# Altium PCB Receiver_PCB_v1.0.PcbDoc
Units mil, origin at the board's own origin, x right, y up, seen from the top; angles counter-clockwise.
Board outline 1181.1 x 426.58 mil, 2 copper layers (Top Layer, Bottom Layer), stack 57 mil thick; 10 components, 8 nets, 28 pads, 2 vias.
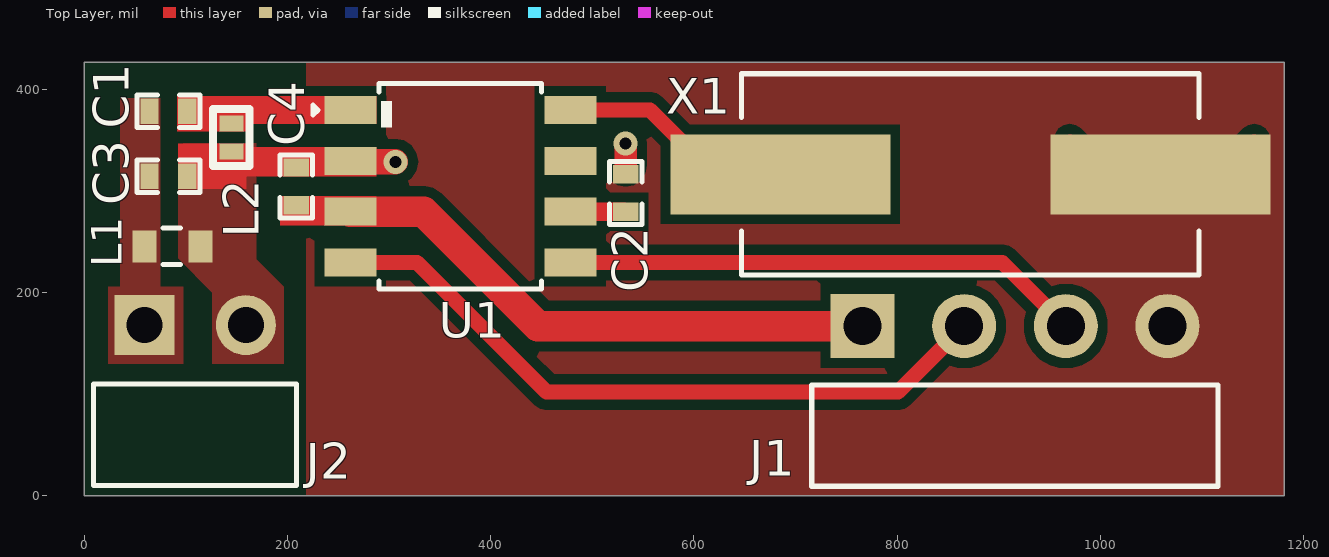
[diagram p0: Top Layer view]
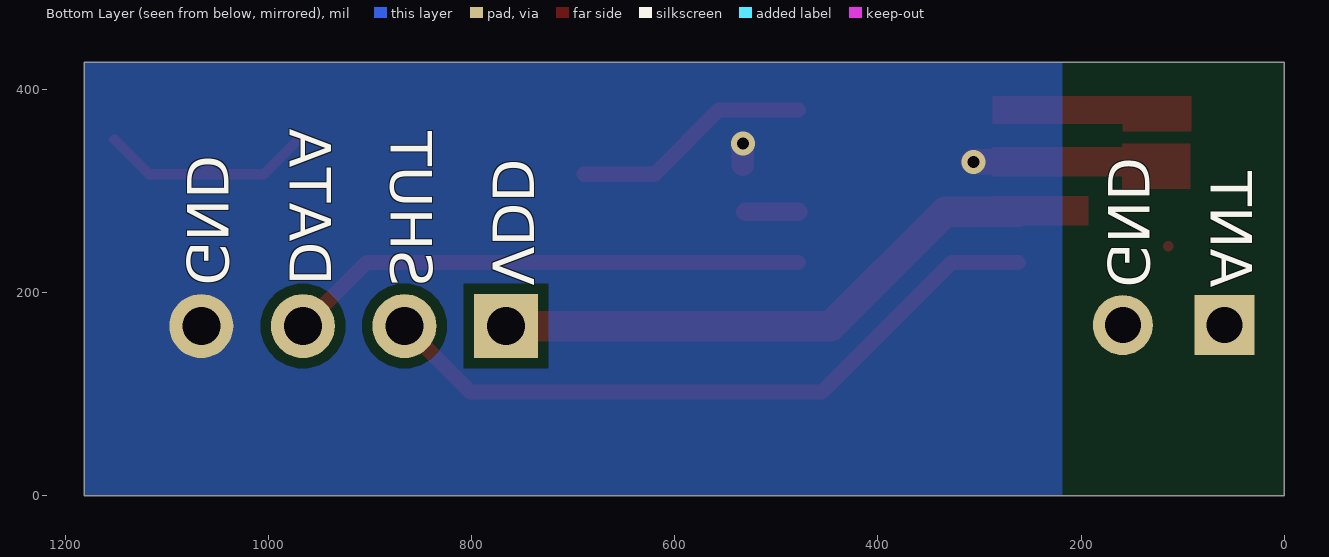
[diagram p1: Bottom Layer view, seen from below]
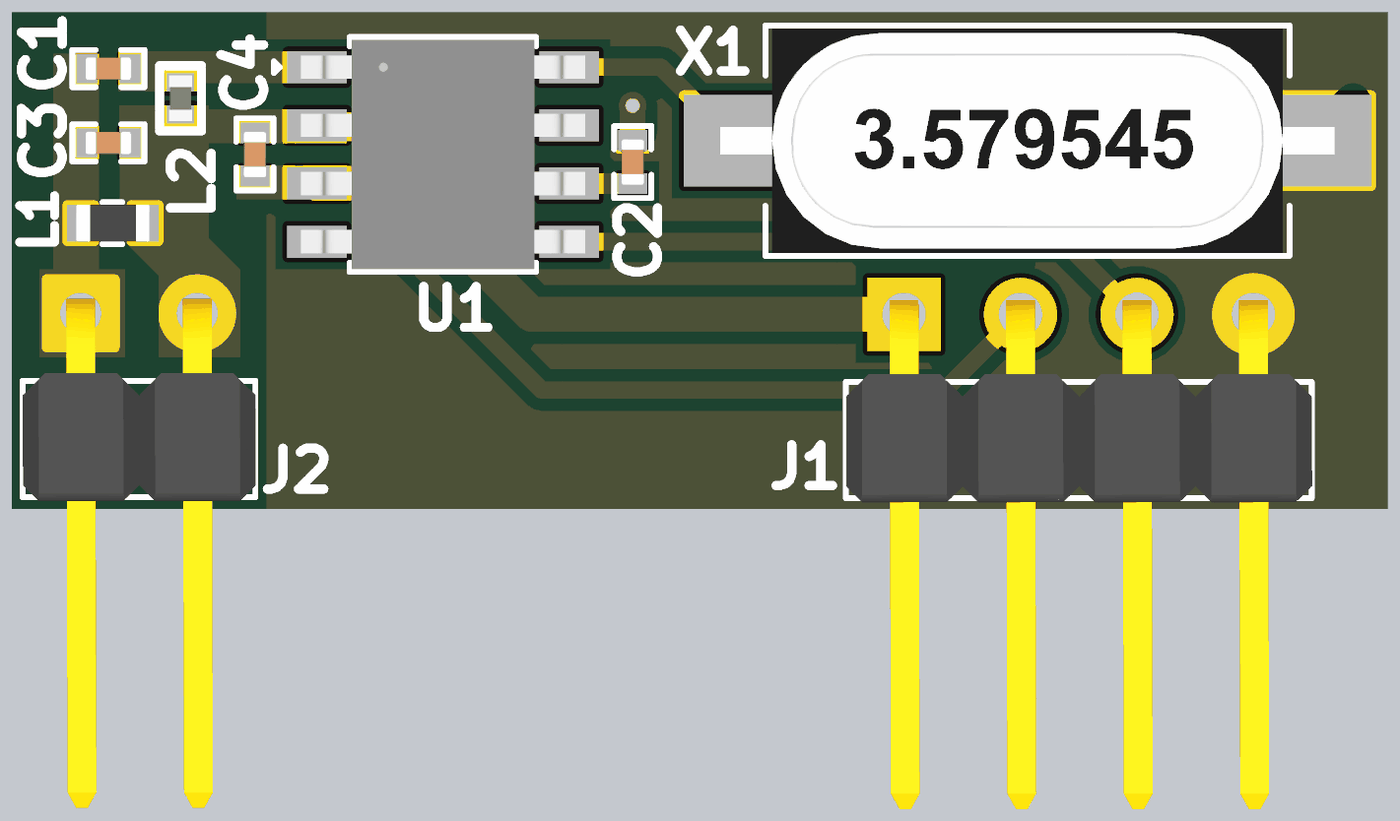
[diagram p2: 3D render of the assembled board from above, using the file's embedded part models]

## Layer stack, top to bottom
Top Solder: solder mask 3, Solder Resist, Dk 3.5
Top Layer: signal copper 10
Dielectric 1: core 37, FR-4, Dk 4.8
Bottom Layer: signal copper 10
Bottom Solder: solder mask 3, Solder Resist, Dk 3.5

## Board outline
0,0 1181.1,0 1181.1,426.58 0,426.58

## Design rules (kind name [scope] priority, off if disabled: settings)
Clearance [All] p1: gap=10 ignorepadtopadclearanceinfootprint=FALSE
HoleToHoleClearance [All] p1: gap=0 allowstackedmicrovias=TRUE
MinimumSolderMaskSliver [All] p1: minsoldermaskwidth=0
PolygonConnect [All] p1: connectstyle=Direct reliefconductorwidth=10 reliefentries=4 polygonreliefangle="90 Angle" airgapwidth=10
RoutingVias [All] p1: holewidth=11.81 width=23.62 viastyle="Through Hole" minholewidth=11.81 minwidth=23.62 maxholewidth=11.81 maxwidth=23.62
SilkToSilkClearance [All] p1: silktosilkclearance=0
SilkToSolderMaskClearance [IsPad] p1: minsilkscreentomaskgap=0 clearancetoexposedcopper=TRUE
SolderMaskExpansion [All] p1: expansion=4 istentingtop=FALSE
Width [All] p1: maxlimit=50 minlimit=10 preferedwidth=15 minimp=50.000000 maximp=50.000000 favimp=50.000000
26 further rules are at their usual default settings.

## Components (designator, comment, footprint, x,y, rotation, side; value= is the part's Value field where it differs from the comment)
C1 "2.4pF" Cap-0402 82.76,378.35 r0 top
C2 "0.1uF" Cap-0402 533,298 r90 top locked value=100nF
C3 "6pF" Cap-0402 82.76,314.47 r180 top
C4 "0.1uF" Cap-0402 208.6,304.54 r270 top value=100nF
J1 "PZ254R-11-04P" "HDR1X4 (R/A Male)" 766,167.02 r0 top locked
J2 "PZ254R-11-02P" "HDR1X2 (R/A Male)" 59,168 r0 top locked
L1 "27nH" "IND-0603 (1608 Metric)" 86.61,245.48 r180 top
L2 "33nH" IND-0402 144.69,352.76 r90 top locked
U1 "WF531RA N S8T" SOP-8 370.08,304.54 r0 top locked
X1 "SXMH6.7458F2020F30" HC-49S-SMD 871.98,316.35 r0 top locked

## Footprints (in the part's own frame and the unit in brackets; to place one, negate y for a bottom-side part, rotate by r counter-clockwise, add the part's x,y. Pads: shape width x height; smd on the part's side, far side on the other; paste and mask are expansions set on the pad)
Cap-0402 [mil]
  rect 18x25 smd mask+2.36: 1(-18.5,0) 2(18.5,0)
  silkscreen extent -31,-16 31,16, body extent -20,-10 20,10, height 19
HC-49S-SMD [mm]
  rect 5.5x2 smd: 1(-4.75,0) 2(4.75,0)
  silkscreen extent -5.71,-2.51 5.71,2.51, body extent -6.7,-2.45 6.7,2.45, height 4.4
"HDR1X2 (R/A Male)" [mm] "CONN HEADER VERT 2POS 2.54MM"
  rect 1.5x1.5 hole 0.9: 1(0,0)
  round 1.5 hole 0.9: 2(2.54,0)
  silkscreen extent -1.27,-4.01 3.81,-1.47, body extent -1.27,-10.8 3.82,0.32, height 3.09
"HDR1X4 (R/A Male)" [mm] "Connector; Header; 4 Position"
  rect 1.6x1.6 hole 0.95: 1(0,0)
  round 1.6 hole 0.95: 2(2.54,0) 3(5.08,0) 4(7.62,0)
  silkscreen extent -1.27,-4.01 8.89,-1.47, body extent -1.27,-10.8 8.9,0.32, height 3.09
IND-0402 [mm]
  rect 0.4x0.6 smd: 1(-0.35,0) 2(0.35,0)
  silkscreen extent -0.71,-0.46 0.71,0.46, body extent -0.5,-0.25 0.5,0.25, height 0.25
"IND-0603 (1608 Metric)" [mm] "0.063\" L x 0.032\" W (1.60mm x 0.80mm)"
  rect 0.6x0.8 smd: 1(-0.7,0) 2(0.7,0)
  silkscreen extent -0.2,-0.46 0.23,0.46, body extent -0.8,-0.4 0.8,0.4, height 0.78
SOP-8 [mm]
  rect 1.3x0.7 smd: 1(-2.75,1.905) 2(-2.75,0.635) 3(-2.75,-0.635) 4(-2.75,-1.905) 5(2.75,-1.905) 6(2.75,-0.635) 7(2.75,0.635) 8(2.75,1.905)
  silkscreen extent -3.69,-2.57 2.03,2.57, body extent -3.1,-2.5 3.1,2.5, height 1.76

## Part data
C1: library part 0402CG2R4C500NT, "50V 2.4pF C0G 0402 Multilayer Ceramic Capacitors MLCC - SMD/SMT ROHS", LCSC Part Number=C48346, Manufacturer=FH, Package=0402, ComponentLink1Description=LCSC, Item Type=Capacitor, Manufacturer Part Number=0402CG2R4C500NT
C2 C4: library part GRM155R71C104KA88D, "CAP CER 0.1UF 16V X7R 0402", Case Code (Imperial)=0402, Case Code (Metric)=1005, Dielectric=X7R, Dielectric Material=Ceramic, Insulation Resistance=10GR, LCSC Part Number=C71629, Manufacturer=Murata, Max Operating Temperature=125°C, Min Operating Temperature=-55°C, Package Quantity=1, Tolerance=10%, Voltage=16V, Case/Package=0402, Category="Ceramic Capacitors", ComponentLink1Description=https://datasheet.ciiva.com/129/grm155r71c104ka88-01-129739.pdf?src-supplier=Digi-Key, ComponentLink1URL=https://datasheet.ciiva.com/129/grm155r71c104ka88-01-129739.pdf?src-supplier=Digi-Key, ComponentLink2Description=https://datasheet.ciiva.com/129/grm155r71c104ka88-01-129740.pdf?src-supplier=Digi-Key, ComponentLink2URL=https://datasheet.ciiva.com/129/grm155r71c104ka88-01-129740.pdf?src-supplier=Digi-Key, ComponentLink3Description=https://datasheet.ciiva.com/18102/getdatasheetpartid-85307-18102905.pdf?src-supplier=Verical, ComponentLink3URL=https://datasheet.ciiva.com/18102/getdatasheetpartid-85307-18102905.pdf?src-supplier=Verical, ComponentLink4Description=https://datasheet.ciiva.com/29199/454098-da-01-en-vs-kondensator-0402-29199799.pdf?src-supplier=Conrad, ComponentLink4URL=https://datasheet.ciiva.com/29199/454098-da-01-en-vs-kondensator-0402-29199799.pdf?src-supplier=Conrad, ComponentLink5Description=https://datasheet.ciiva.com/7937/4360-7937615.pdf?src-supplier=Element14, ComponentLink5URL=https://datasheet.ciiva.com/7937/4360-7937615.pdf?src-supplier=Element14, ComponentLink6Description=https://datasheet.ciiva.com/14116/grmseries-highdielectrictype-eng-14116878.pdf?src-supplier=Distrelec, ComponentLink6URL=https://datasheet.ciiva.com/14116/grmseries-highdielectrictype-eng-14116878.pdf?src-supplier=Distrelec, ComponentLink7Description=https://datasheet.ciiva.com/14103/grmseries-highdielectrictype-eng-14103750.pdf?src-supplier=Distrelec, ComponentLink7URL=https://datasheet.ciiva.com/14103/grmseries-highdielectrictype-eng-14103750.pdf?src-supplier=Distrelec, ComponentLink8Description=https://datasheet.ciiva.com/28534/4360-28534127.pdf?src-supplier=Element14, ComponentLink8URL=https://datasheet.ciiva.com/28534/4360-28534127.pdf?src-supplier=Element14, ComponentLink9Description=https://datasheet.ciiva.com/28534/4360-28534133.pdf?src-supplier=Element14, ComponentLink9URL=https://datasheet.ciiva.com/28534/4360-28534133.pdf?src-supplier=Element14, ComponentLink10Description=https://datasheet.ciiva.com/16199/product-16199000.pdf?src-supplier=Future+Electronics, ComponentLink10URL=https://datasheet.ciiva.com/16199/product-16199000.pdf?src-supplier=Future+Electronics, Depth=0.5mm, Height=0.5mm, Item Type=Capacitor, Lead Free="Lead Free", Length=1mm, Manufacturer Part Number=GRM155R71C104KA88D, Material=Ceramic, Mounting Technology="Surface Mount", Packaging="Tape and Reel", Pins=2, Pricing 1="10000=0.00480, 30000=0.00470, 100000=0.00350, 250000=0.00330 (USD)", Radiation Hardening=No, RoHS=Yes, RoHS Compliant=Yes, Series=GRM, Stock 1=1690322, Supplier 1="Arrow Electronics", Supplier Part Number 1=GRM155R71C104KA88D, Termination=SMD/SMT, Thickness=0.022inch, Voltage Rating=16V, Voltage Rating (DC)=16V, Width=0.02inch
C3: library part 0402CG6R0C500NT, "50V 6pF C0G 0402 Multilayer Ceramic Capacitors MLCC - SMD/SMT ROHS", LCSC Part Number=C1575, Manufacturer="FH (Guangdong Fenghua Advanced Tech)", Package=0402, ComponentLink1Description=LCSC, Item Type=Capacitor, Manufacturer Part Number=0402CG6R0C500NT
J1: "Right-Angle Square Pins 2.5mm 4P 6mm -40℃~+105℃ 2.54mm Plugin Black Brass 1x4P Push-Pull,P=2.54mm Pin Headers ROHS", LCSC Part Number=C492412, Manufacturer=XFCN, Package=Push-Pull,P=2.54mm, ComponentLink1Description=LCSC, ComponentLink1URL=https://www.lcsc.com/product-detail/Pin-Headers_XFCN-PZ254R-11-04P_C492412.html, Item Type="R/A Male Header", Manufacturer Part Number=PZ254R-11-04P
J2: "Right-Angle Square Pins 2.5mm 2P 6mm -40℃~+105℃ 2.54mm Plugin Black Brass 1x2P Push-Pull,P=2.54mm Pin Headers ROHS", LCSC Part Number=C492410, Manufacturer=XFCN, Package=Push-Pull,P=2.54mm, ComponentLink1Description=LCSC, ComponentLink1URL=https://www.lcsc.com/product-detail/Pin-Headers_XFCN-PZ254R-11-02P_C492410.html, Item Type="R/A Male Header", Manufacturer Part Number=PZ254R-11-02P
L1: library part LQW18AN27NG10D, "FIXED IND 27NH 590MA 116MOHM SMD", Case Code (Imperial)=0603, Case Code (Metric)=1608, Current Rating=590mA, DC Resistance (DCR)=116mR, Inductance Tolerance=2%, LCSC Part Number=C701182, Manufacturer=Murata, Max Operating Temperature=125°C, Min Operating Temperature=-55°C, Package Quantity=1, Resistor Type=Wirewound, Self Resonant Frequency=2.8GHz, Test Frequency=100MHz, Case/Package=0603, Category="Fixed Inductors", ComponentLink1Description=https://datasheet.ciiva.com/11799/0900766b80a002db-11799175.pdf?src-supplier=RSComponents, ComponentLink1URL=https://datasheet.ciiva.com/11799/0900766b80a002db-11799175.pdf?src-supplier=RSComponents, ComponentLink2Description=https://datasheet.ciiva.com/6705/l0075s0080lqw18a-10-6705574.pdf?src-supplier=Digi-Key, ComponentLink2URL=https://datasheet.ciiva.com/6705/l0075s0080lqw18a-10-6705574.pdf?src-supplier=Digi-Key, ComponentLink3Description=https://datasheet.ciiva.com/8507/l0075s0080lqw18a-10-8507510.pdf?src-supplier=Avnet, ComponentLink3URL=https://datasheet.ciiva.com/8507/l0075s0080lqw18a-10-8507510.pdf?src-supplier=Avnet, ComponentLink4Description=https://datasheet.ciiva.com/4978/product-4978252.pdf?src-supplier=Mouser, ComponentLink4URL=https://datasheet.ciiva.com/4978/product-4978252.pdf?src-supplier=Mouser, Core Material=Non-Magnetic, DC Current=590mA, Depth=1.1mm, Height=0.8mm, Height - Seated (Max)=0.039inch, Inductance=27nH, Item Type=Inductor, Lead Free="Lead Free", Length=1.6mm, Manufacturer Part Number=LQW18AN27NG10D, Max DC Current=590mA, Military Standard=Not, Mount="Surface Mount", Packaging="Tape and Reel", Pricing 1="1=0.17550, 10=0.13260, 25=0.13120, 100=0.10470, 250=0.09530, 500=0.08580, 1000=0.07160, 3000=0.06500 (USD)", Q Factor=42, Radiation Hardening=No, Reach SVHC Compliant=Yes, RoHS=Yes, RoHS Compliant=Yes, Series=LQW18A_10, Shielding=Unshielded, Stock 1=3528, Supplier 1="Arrow Electronics", Supplier Part Number 1=LQW18AN27NG10D, Termination=SMD/SMT, Tolerance=2%, Weight=0.000106oz, Width=0.031inch
L2: library part LQG15HN33NH02D, "300mA 33nH ±3% 670mΩ 0402 Inductors (SMD) ROHS", LCSC Part Number=C2044267, Manufacturer="Murata Electronics", Package=0402, ComponentLink1Description=LCSC, ComponentLink1URL=https://www.lcsc.com/product-detail/Inductors-SMD_Murata-Electronics-LQG15HN33NH02D_C2044267.html, Item Type=Inductor, Manufacturer Part Number=LQG15HN33NH02D
U1: "SOP-8 RF Transceiver ICs ROHS", LCSC Part Number=C2886629, Manufacturer=WF, Package=SOP-8, Item Type=IC, Manufacturer Part Number="WF531RA N S8T"
X1: "6.7458MHz 20pF ±20ppm HC-49S-SMD Crystals ROHS", LCSC Part Number=C2901748, Manufacturer="Shenzhen SCTF Elec", Package=HC-49S-SMD, ComponentLink1Description=LCSC, ComponentLink1URL=https://www.lcsc.com/product-detail/Crystals_Shenzhen-SCTF-Elec-SXMH6-7458F2020F30_C2901748.html, Item Type=Crystals, Manufacturer Part Number=SXMH6.7458F2020F30

## Via types
v1: diameter 23.62, hole 11.81, Top Layer to Bottom Layer, tented both sides, 2 vias

## Nets (pads, with @x,y where several pads share a name; then routed paths per layer and width w, separated by ;. In a path a pad name is that pad's centre, name@x,y a point inside that pad or via, vN(x,y) a via of type N, cw(c..) or ccw(c..) an arc to the next point about the centre after c; other vN are vias at no path point)
Antenna: C1.1 C3.2 J2.1 L1.2
DO: J1.3 U1.5 | length 513.6
  Top Layer w15: U1.5 903.48,229.54 J1.3
GND: C2.2 C3.1 C4.1 J1.4 J2.2 L1.1 L2.1 U1.2 X1.2 | length 292.4
  Top Layer w10: L1.1@114.09,245.39 L1.1 ; C4.1@211.08,321.52 C4.1@212.6,323.04 ; X1.2@970.07,350.72 1004.44,316.35 X1.2@1053.15,316.35 ; X1.2@1062.99,326.19 X1.2@1053.15,316.35 ; X1.2@1151.57,350.72 1117.2,316.35 X1.2@1053.15,316.35
  Top Layer w22: C2.2@532.9,325.5 v1(532.9,346.47)
  Top Layer w25: U1.2@260.81,328.54 v1(306.09,328.54)
NetC1_2: C1.2 L2.2 U1.1
NetC2_1: C2.1 U1.6 | length 52.2
  Top Layer w18: U1.6 C2.1@530.5,279.54
NetU1_8: U1.8 X1.1 | length 236.8
  Top Layer w15: U1.8 556.89,379.54 620.08,316.35 X1.1@688.98,316.35
Shut: J1.2 U1.4 | length 683.9
  Top Layer w15: U1.4 327.46,229.54 333.99,223.01 455,102 800.98,102 J1.2
VDD: C4.2 J1.1 U1.3 | length 559.8
  Top Layer w15: C4.2@212.6,277.04 C4.2@212.6,286.04
  Top Layer w30: U1.3 333.86,279.54 446.38,167.02 J1.1
pads on no net: U1.7

## Polygon pours and split planes (outlines as drawn)
GND on Top Layer "GND_L01_P002" (solid, pour order 2): 218.49,0 1181.1,0 1181.1,426.58 218.49,426.58
GND on Top Layer "GND_L01_P005" (solid, remove dead copper, pour order 5): 92.17,346.86 92.26,346.78 92.26,271.33 92.26,233.76 125.98,200.03 125.98,130 196.1,130 196.1,205.76 169,232.85 169,346.86
Antenna on Top Layer "ANTENNA_L01_P001" (solid, pour order 1): 74.8,205.76 97.24,205.76 97.24,130 23.62,130 23.62,205.76 35.43,205.76 35.43,391.07 74.8,391.07
GND on Bottom Layer "GND_L02_P006" (solid, pour order 6): 218.49,0 1181.1,0 1181.1,426.58 218.49,426.58

## Other copper
Top Layer:
  region net NetC1_2: 159.05,393.3 91.38,393.3 91.38,358.39 159.05,358.39
  rectangle net GND: 92.17,302.04 159.84,346.86
  rectangle net GND: 92.26,314.04 287.4,343.31
  rectangle net VDD: 192.6,265.76 287.4,295.04
  rectangle net NetC1_2: 92.26,365.76 287.4,393.31

## Silkscreen, mask and mechanical layers (free items; w line width, h text height)
Bottom Overlay:
  text "VDD" at 792.67,206.59 h70 r90
  text "SHUT" at 893.5,205.77 h70 r90
  text "DATA" at 992.67,206.59 h70 r90
  text "GND" at 1093.5,206.59 h70 r90
  text "ANT" at 86.44,204.59 h70 r90
  text "GND" at 187.26,204.59 h70 r90
Board Outline:
  the board outline again, w10
Fabrication:
  drawing of 191 lines, arcs and shapes, not listed
  text "Layer" at 1359.5,468.79 h60
  text "Name" at 1769.41,468.79 h60
  text "Material" at 2699.16,468.79 h60
  text "Thickness" at 3558.92,468.79 h60
  text "Constant" at 4208.76,468.79 h60
  text "Board Layer Stack" at 4778.62,468.79 h60
  text "Top Overlay" at 1769.41,348.79 h60
  text "Top Solder" at 1769.41,228.79 h60
  text "Solder Resist" at 2699.16,228.79 h60
  text "3.00mil" at 3558.92,228.79 h60
  text "3.5" at 4208.76,228.79 h60
  text "1" at 1359.5,108.79 h60
  text "Top Layer" at 1769.41,108.79 h60
  text "10.00mil" at 3558.92,108.79 h60
  text "Dielectric 1" at 1769.41,-11.21 h60
  text "FR-4" at 2699.16,-11.21 h60
  text "37.00mil" at 3558.92,-11.21 h60
  text "4.8" at 4208.76,-11.21 h60
  text "2" at 1359.5,-131.21 h60
  text "Bottom Layer" at 1769.41,-131.21 h60
  text "10.00mil" at 3558.92,-131.21 h60
  text "Bottom Solder" at 1769.41,-251.21 h60
  text "Solder Resist" at 2699.16,-251.21 h60
  text "3.00mil" at 3558.92,-251.21 h60
  text "3.5" at 4208.76,-251.21 h60
  text "Bottom Overlay" at 1769.41,-371.21 h60
  text "Total board thickness:" at 1359.5,-491.21 h60
  text "63.00mil" at 3558.92,-491.21 h60
Drill Drawing:
  circle w10: c53.69,1239.33 r33.33
  lines w10: 20.36,972.67 87.02,972.67 53.69,906 20.36,972.67 ; 20.36,1056 87.02,1056 87.02,1122.67 20.36,1122.67 20.36,1056
  lines w15: -39.44,861 6960.67,861 ; -39.44,1311 6960.67,1311 ; 511.44,711 511.44,1461 ; 991.32,711 991.32,1461 ; 2091,711 2091,1461 ; 2596.88,711 2596.88,1461 ; 3330.68,711 3330.68,1461 ; 4830.23,711 4830.23,1461 ; 5420.08,711 5420.08,1461 ; 6165.88,711 6165.88,1461 ; -39.44,711 6960.67,711 6960.67,1461 -39.44,1461 -39.44,711
  text "Symbol" at 50.56,1356 h72
  text "Count" at 556.44,1356 h72
  text "Hole Size" at 1036.32,1356 h72
  text "Plated" at 2136,1356 h72
  text "Hole Type" at 2641.88,1356 h72
  text "Drill Layer Pair" at 3375.68,1356 h72
  text "Via/Pad" at 4875.23,1356 h72
  text "Pad Shape" at 5465.08,1356 h72
  text "Template" at 6210.88,1356 h72
  text "2" at 556.44,1206 h60
  text "11.81mil (0.300mm)" at 1036.32,1206 h60
  text "PTH" at 2136,1206 h60
  text "Round" at 2641.88,1206 h60
  text "Top Layer - Bottom Layer" at 3375.68,1206 h60
  text "Via" at 4875.23,1206 h60
  text "Rounded" at 5465.08,1206 h60
  text "v60h30m0mx0" at 6210.88,1206 h60
  text "2" at 556.44,1056 h60
  text "35.43mil (0.900mm)" at 1036.32,1056 h60
  text "PTH" at 2136,1056 h60
  text "Round" at 2641.88,1056 h60
  text "Top Layer - Bottom Layer" at 3375.68,1056 h60
  text "Pad" at 4875.23,1056 h60
  text "(Mixed)" at 5465.08,1056 h60
  text "(Mixed)" at 6210.88,1056 h60
  text "4" at 556.44,906 h60
  text "37.40mil (0.950mm)" at 1036.32,906 h60
  text "PTH" at 2136,906 h60
  text "Round" at 2641.88,906 h60
  text "Top Layer - Bottom Layer" at 3375.68,906 h60
  text "Pad" at 4875.23,906 h60
  text "(Mixed)" at 5465.08,906 h60
  text "(Mixed)" at 6210.88,906 h60
  text "8 Total" at 556.44,756 h60

## Dimensions
0,426.58 to 0,0 on Dimensions
0,426.58 to 1181.1,426.58 on Dimensions